# Altium PCB Interface-Board_v3.3.PcbDoc (part 3 of 3)
Units mil, origin at the board's own origin, x right, y up, seen from the top; angles counter-clockwise.
Board outline 1629.92 x 1653.54 mil, 4 copper layers (Top Layer, Power, Ground, Bottom Layer), stack 61.899 mil thick; 90 components, 56 nets, 294 pads, 167 vias.
Unrouted connection lines stored in the file: 1.
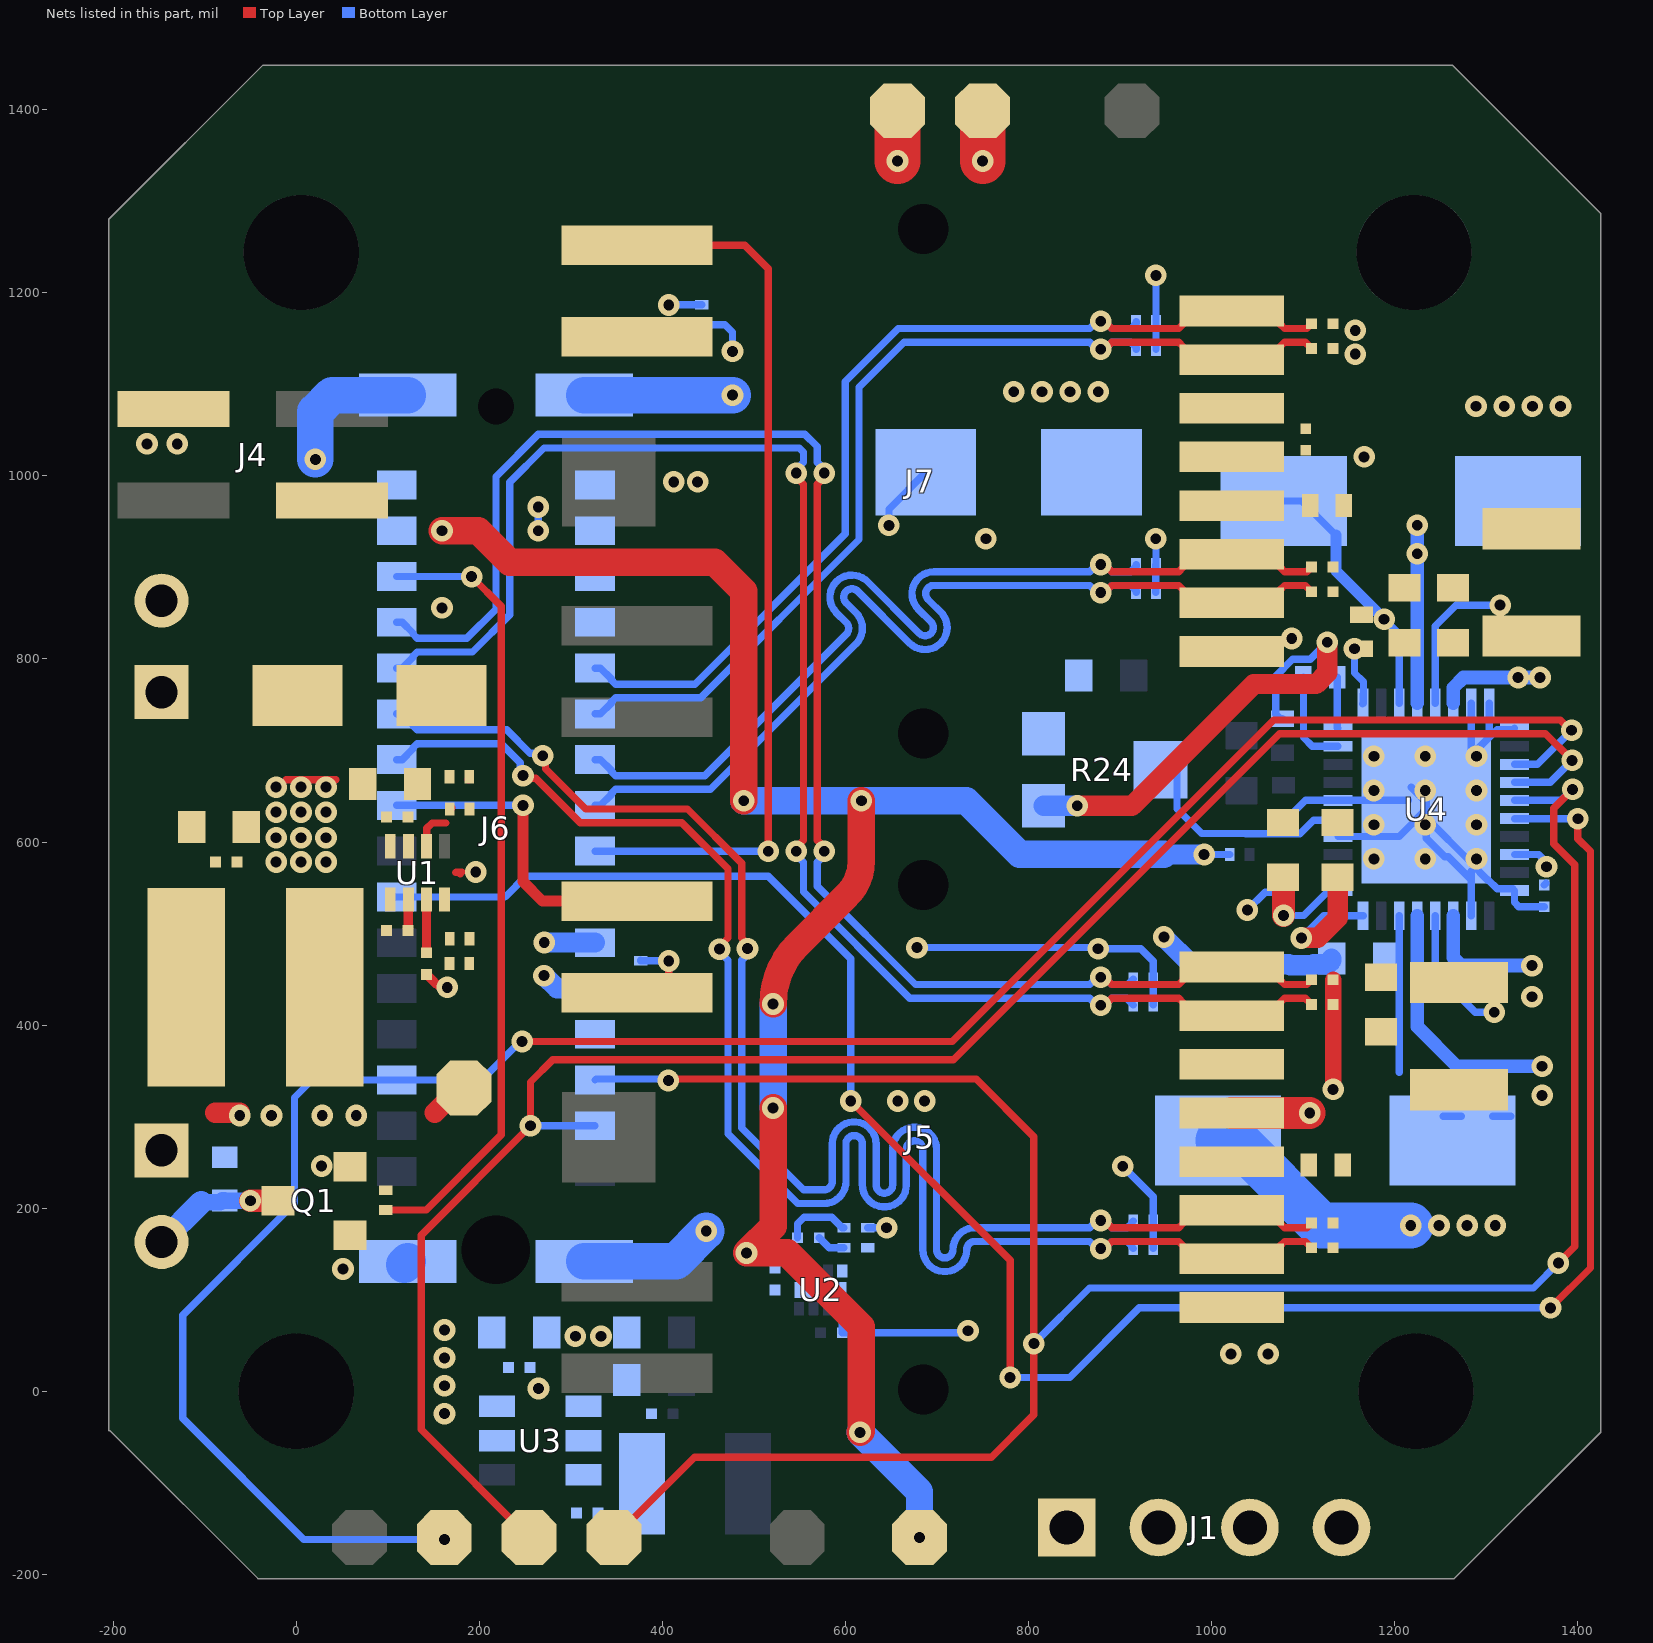
[diagram p4: the nets of this part, all layers, seen from the top]

## Via types
v1: diameter 23.62, hole 11.81, Top Layer to Bottom Layer, tented both sides, 135 vias
v2: diameter 23.62, hole 11.81, Top Layer to Bottom Layer, 32 vias

## Nets (pads, with @x,y where several pads share a name; then routed paths per layer and width w, separated by ;. In a path a pad name is that pad's centre, name@x,y a point inside that pad or via, vN(x,y) a via of type N, cw(c..) or ccw(c..) an arc to the next point about the centre after c; other vN are vias at no path point) (continued)
GND: C2.1 C3.1 C4.1 C5.1 C6.1 C9.1 C10.1 C11.1 C12.1 C13.2 C14.1 C15.1 C16.2 C17.2 C18.2 C19.2 C20.2 C21.2 C22.2 C23.2 C24.2 C25.2 C26.2 C27.1 C28.2 C29.2 C30.1 C31.1 C34.1 C35.2 C36.2 C37.2 D3.1 J2.2 J4.4 J6.A12 J6.A13 J6.MP1 J6.MP2 J6.MP3 J6.MP4 P10.1 Q1.2 R3.1 R4.1 R6.1 R7.2 R12.1 R17.1 R21.2 R22.2 R24.1 SB1.2 SB2.2 U1.4 U2.5 U2.9 U3.4 U4.1 U4.10 U4.12 U4.22 U4.24 U4.35 U4.36 U4.37 | length 2908.6
  Top Layer w8: -10.92,668.02 43.56,668.02 ; 174.38,566.68 174.89,567.19 181.12,567.19 179.15,565.22
  Top Layer w10: C6.1@142.34,455.41 150.63,447.12 ccw(c165.1,461.6) v1(165.1,441.12) v1@162.5,443.73
  Top Layer w18: v1(1132.89,329.74) C18.2@1132.89,422.45 C16.2@1132.89,449.58
  Top Layer w22: v1(853.39,639.56) 913.26,639.56 1046.26,772.56 1114.34,772.56 1126.51,784.73 v1(1126.51,818.18)
  Top Layer w50: v1(657.03,1344) P10.1@657.03,1398.9
  Bottom Layer w8: v1(270.82,454.03) v1@271.05,454.03 ; R17.1@443,1165.17 468.6,1165.17 476.77,1157 v1(476.77,1136) ; U2.9@573,110.66 591.96,110.66 596.62,106 U2.5@596.62,89.99 C9.1@596.62,63.79 731.79,63.79 v1(734,66) ; R6.1@624.47,178.5 v1(645.09,178.5) ; v1(647.61,945.87) 647.61,963.71 D3.1@687.87,1003.97 ; C27.1@1077.41,734.62 1075.14,734.62 1070.14,739.62 1070.14,781.04 1088.6,799.5 1107.83,799.5 v1(1126.51,818.18) ; C35.2@1078.89,625.15 1082.39,625.15 1102.7,645.47 U4.24@1138.14,645.47 U4.37@1214.85,645.47 ; U4.22@1138.14,606.1 1205.07,606.1 U4.37@1234.59,635.63 ; U4.37@1218.35,659.75 1234.59,643.5 U4.37@1234.59,635.63 ; U4.12@1283.81,519.48 U4.37@1283.81,554.92 ; U4.37@1283.81,568.09 U4.37@1283.81,554.92 ; U4.35@1283.81,751.77 1283.81,694.68 U4.37@1303.49,714.37 ; U4.36@1303.49,751.77 U4.37@1303.49,714.37 ; U4.1@1331.05,724.21 1329.77,722.93 1312.05,722.93 U4.37@1303.49,714.37 ; C34.1@1363.49,529.33 1335.74,529.33 1331.05,534.01 U4.10@1331.05,547.04 1329.15,548.95 1312.05,548.95 1302.08,558.92 1301.46,558.92 1284.54,575.84 1284.54,576.46 U4.37@1234.59,626.41 ; U4.37@1234.59,626.41 1234.59,604.13 1254.72,584.01 1258.72,584.01 1283.81,558.92 U4.37@1283.81,554.92 ; U4.37@1234.59,626.41 U4.37@1234.59,635.63
  Bottom Layer w22: v1@271.05,454.03 285.08,440 J6.A12@326.54,440 ; R24.1@816.36,639.56 v1(853.39,639.56) ; v1(948.01,496.26) 977.82,466.45 1084.72,466.45 1085.85,465.32 1110.54,465.32 1111.67,466.45 1127.29,466.45 1131.29,470.45 C31.1@1131.29,472.48
  Bottom Layer w40: v1(21,1018) 21,1069.86 39.37,1088.23 J6.MP2@121.81,1088.23 ; J6.MP3@118.19,138.15 J6.MP3@121.81,141.77 ; J6.MP4@314.72,141.77 414.77,141.77 v1(448,175) ; J6.MP1@314.72,1088.23 v1(476.77,1088.23)
  Bottom Layer w50: C29.2@1007.29,274 1026.98,274 1119.98,181 v1(1217.77,181)
  other v1: 51.21,133.47 1248.56,181 1279.34,181 1310.12,181 27.82,245.98 196.12,567.19 1177.48,581.51 1233.53,581.51 1289.59,581.51 1177.48,618.88 1233.53,618.88 1289.59,618.88 1177.48,656.25 1233.53,656.25 1289.59,656.25 1177.48,693.62 1233.53,693.62 1289.59,693.62 1289,1076 1319.78,1076 1350.56,1076 1381.34,1076 1157,1133 1157,1159
  other v2: 264.79,3 305.07,60 333.05,60 -21.92,578.13 5.32,578.13 32.56,578.13 -21.92,604.55 5.32,604.55 32.56,604.55 -21.92,632.61 5.32,632.61 32.56,632.61 -21.92,660.02 5.32,660.02 32.56,660.02
GND_ETH: C26.1 J5.4 J5.8 J7.4 J7.8 | length 96.8
  Top Layer w8: J7.8@1021.91,808.1 J7.8@1025.12,811.31 ; v1@1163.73,1022.04 1167.01,1018.76 1166.71,1018.76 v1@1164.73,1018.76
  Top Layer w35: J5.4@1021.91,303.98 v1(1107.3,303.98)
  other v1: 1021.23,40.79 1061.83,40.79 1087.61,822.29 1166.71,1020.76
LINK0: J5.9 J6.B8 | length 354.5
  Top Layer w12: v1(247.84,640) 247.84,556.65 269.2,535.28 J5.9@372.31,535.28
  Bottom Layer w8: J6.B8@110,640 v1(247.84,640)
LINK1: J6.A9 J7.9 | length 979.6
  Top Layer w8: J7.9@372.31,1252 490,1252 515.77,1226.23 v1(515.77,590)
  Bottom Layer w8: J6.A9@326.54,590 v1(515.77,590)
MISO: J6.A14 P7.1 U4.5 | length 2546.4
  Top Layer w8: P7.1@347.16,-160 435.16,-72 759.74,-72 806,-25.74 v1(806,52) 806,277.98 742.98,341 408.25,341 v1(406.63,339.38) ; v1(1379,140) 1397,158 1397,575 1374,598 1374,636.92 v1(1394.56,657.48)
  Bottom Layer w8: J6.A14@326.54,340 327.54,341 405.01,341 v1(406.63,339.38) ; v1(806,52) 866.8,112.8 1351.8,112.8 v1(1379,140) ; U4.5@1331.05,645.47 1382.06,645.47 1394.07,657.48 v1(1394.56,657.48)
MOSI: J6.A15 P9.1 U4.4 | length 2047.4
  Top Layer w8: P9.1@254.6,-160 136.51,-41.91 136.51,170.51 v1(256,290) 256,337.8 280.39,362.19 718.19,362.19 1074.3,718.3 1364.94,718.3 v1(1394.03,689.21)
  Bottom Layer w8: v1(256,290) J6.A15@326.54,290 ; U4.4@1331.05,665.15 1369.97,665.15 v1(1394.03,689.21)
MOTOR_A1: J1.1 U4.34 | length 116.3
  Bottom Layer w15: U4.34@1264.12,751.77 1264.12,768.59 1275.27,779.73 v1(1358.97,779.73)
  other v1: 1335,779.73
MOTOR_A2: J1.2 U4.32 | length 194.2
  Bottom Layer w15: U4.32@1224.75,751.77 v1(1224.75,946)
  other v1: 1224.75,915
MOTOR_B1: J1.3 U4.13 | length 135.4
  Bottom Layer w15: U4.13@1264.12,519.48 1264.12,473.79 1272.91,465 v1(1350.17,465)
  other v1: 1350.17,431
MOTOR_B2: J1.4 U4.15 | length 278
  Bottom Layer w15: U4.15@1224.75,519.48 1224.75,398.25 1267.97,355.03 v1@1360.09,355.03
  Bottom Layer w50: J1.4@1142,-149 J1.4@1144.49,-146.51
  other v1: 1361.17,323.21 1361.17,355.03
NetC1_1: C1.1 U1.6 | length 34
  Top Layer w8: C1.1@122.21,503.22 C1.1@122.39,503.39 ; U1.6@122.39,536.91 U1.6@122.56,537.08
  Top Layer w10: C1.1@122.39,503.39 U1.6@122.39,536.91
NetC1_2: C1.2 L1.1 U1.5
NetC6_2: C6.2 U1.7 | length 56
  Top Layer w10: C6.2@142.24,481.12 U1.7@142.24,537.08
NetC7_1: C7.1 L2.1 U3.5
NetC7_2: C7.2 U3.6
NetC8_1: C8.1 R5.1 R6.2 U2.4 | length 31.6
  Bottom Layer w8: C8.1@571.43,167.66 582.25,156.84 R5.1@598.49,156.84
NetC32_1: C32.1 U4.29 | length 74.4
  Bottom Layer w8: v1(1156.32,811.18) 1156.32,784.68 1166,775 1166,752 U4.29@1165,751 ; U4.29@1165.7,751.77 U4.29@1165.7,761.61
NetC33_1: C33.1 U4.28 | length 56.1
  Bottom Layer w8: C33.1@1137.5,780 1137.5,724.85 U4.28@1138.14,724.21
NetC33_2: C33.2 U4.27 | length 107.5
  Bottom Layer w8: C33.2@1100.5,780 1100.5,714.12 1110.1,704.52 U4.27@1138.14,704.52
NetC36_1: C36.1 R21.1 U4.33 | length 164.6
  Bottom Layer w8: U4.33@1244.44,751.77 1244.44,836.03 1267.22,858.81 v1(1315.3,858.81)
NetC37_1: C37.1 R22.1 U4.14 | length 145.4
  Bottom Layer w8: U4.14@1244.44,519.48 1244.44,457.78 1288.24,413.97 v1@1310,413.97
  other v1: 1309,413.97
NetD2_2: D2.2 J2.1
NetJ5_10: J5.10 R12.2 | length 90.2
  Top Layer w8: J5.10@372.31,435.28 389.35,435.28 407,452.94 v1(407,469.98)
  Bottom Layer w8: R12.2@376.14,470.76 R12.2@376.54,470.37 406.61,470.37 v1(407,469.98)
NetJ7_10: J7.10 R17.2 | length 35.9
  Bottom Layer w8: v1@407.13,1186.83 R17.2@443,1186.83
  other v1: 407,1186.69
NetR1_1: R1.1 R4.2 U1.2 | length 48.4
  Top Layer w8: U1.2@142.24,595.35 142.73,595.84 142.73,614.93 148.58,620.78 163.26,620.78 ; R4.2@168.58,634.16 168.58,636.12 R4.2@169.89,637.44 ; R1.1@187.89,668.02 R1.1@189.17,669.31
NetR2_1: R2.1 R3.2 U1.8
NetR23_1: R23.1 R24.3
NetR24_2: R24.2 U4.23 | length 236.6
  Bottom Layer w8: R24.2@962.31,678.93 962.31,636.33 989.42,609.22 1037.49,609.22 1037.56,609.15 1096.77,609.15 1111.5,623.88 1136.23,623.88 U4.23@1138.14,625.78
NetSB1_1: SB1.1 U4.19 | length 114.4
  Top Layer w25: v1(1078.81,519.72) 1078.81,561.81 SB1.1@1080,563
  Bottom Layer w8: v1(1078.81,519.72) 1100.72,519.72 1126.14,545.14 1136.23,545.14 U4.19@1138.14,547.04
NetSB2_1: SB2.1 U4.18 | length 172.7
  Top Layer w22: v1(1098.2,495.13) 1098.51,495.45 1116.4,495.45 1137.89,516.93 SB2.1@1137.89,563.32
  Bottom Layer w8: v1(1098.2,495.13) 1122.54,519.48 U4.18@1165.7,519.48
OPTO_IN: J6.B3 Q1.1 R7.1 | length 865.2
  Top Layer w8: R7.1@97.81,198 142,198 224,280 224,857.65 v1(191.65,890)
  Bottom Layer w8: J6.B3@110,890 v1(191.65,890)
RCS: D1.1 J3.2 Q1.3 | length 146.2
  Top Layer w25: v1(-50.02,208) Q1.3@-19.96,208
  Bottom Layer w18: -103.75,206.35 -82.78,206.35 -80.75,208.38 D1.1@-78,208.38 ; D1.1@-78,208 v1(-50.02,208) v1@-50.2,208.19
  Bottom Layer w25: J3.2@-147.1,163 -103.75,206.35
RXA_N: C22.1 J5.7 J6.B7 R15.2 | length 1799.7
  Top Layer w8: v1(247.84,672.5) 250.83,669.51 261.88,669.51 310.26,621.12 421.3,621.12 471.81,570.61 471.81,495.04 464,487.23 v1@464,483 ; v1(462.51,482.97) v1@463.97,482.97 ; v1(879,155.8) 883.23,155.8 891.04,163.61 964.14,163.61 968.83,158.92 968.83,157.27 981.56,144.54 J5.7@1021.91,144.54 1062.27,144.54 1075,157.27 1075,158.92 1079.69,163.61 1102.37,163.61 C22.1@1109.27,156.7
  Bottom Layer w8: J6.B7@110,690 115.91,690 127.65,701.75 127.65,702.81 132.34,707.5 223.89,707.5 244.85,686.54 244.85,675.49 v1(247.84,672.5) ; v1(462.51,482.97) 464,482.97 464,478.77 471.81,470.96 471.81,281.32 548.13,205 565.13,205 576.63,205 ccw(c576.63,229) 600.63,229 600.63,270.19 cw(c609.63,270.19) 618.63,270.19 618.63,225.31 ccw(c642.63,225.31) 666.63,225.31 666.63,264.47 cw(c675.63,264.47) 684.63,264.47 684.63,154.61 ccw(c708.63,154.61) 732.63,154.61 cw(c741.63,154.61) 741.63,163.61 828,163.61 866.96,163.61 874.77,155.8 v1(879,155.8) 883.23,155.8 891.04,163.61 907.84,163.61 912.76,158.69 912.76,157.75 R15.2@914.67,155.85
RXA_P: C20.1 J5.6 J6.B6 R13.2 | length 1798.3
  Top Layer w8: v1(269.49,694.15) 272.48,691.16 272.48,680.12 316.48,636.12 427.51,636.12 486.81,576.83 486.81,495.04 494.62,487.23 494.62,483.57 v1(493.12,483.57) ; v1(879,186.42) 883.23,186.42 891.04,178.61 964.14,178.61 968.83,183.3 968.83,184.95 981.56,197.69 J5.6@1021.91,197.69 1062.27,197.69 1075,184.95 1075,183.3 1079.69,178.61 1104.05,178.61 C20.1@1109.27,183.83
  Bottom Layer w8: J6.B6@110,740 115.91,740 127.65,728.25 127.65,727.19 132.34,722.5 230.1,722.5 255.46,697.14 266.5,697.14 v1(269.49,694.15) ; v1(493.12,483.57) 493.69,483 494.62,483 494.62,478.77 486.81,470.96 486.81,287.53 554.34,220 565.13,220 576.63,220 ccw(c576.63,229) 585.63,229 585.63,270.19 cw(c609.63,270.19) 633.63,270.19 633.63,225.31 ccw(c642.63,225.31) 651.63,225.31 651.63,264.47 cw(c675.63,264.47) 699.63,264.47 699.63,154.61 ccw(c708.63,154.61) 717.63,154.61 cw(c741.63,154.61) 741.63,178.61 828,178.61 866.96,178.61 874.77,186.42 v1(879,186.42) 883.23,186.42 891.04,178.61 908.08,178.61 912.76,183.3 912.76,184 R13.2@914.67,185.91
RXB_N: C23.1 J6.A8 J7.7 R16.2 | length 1122.2
  Top Layer w8: v1(879,872.52) 883.23,872.52 891.04,880.33 964.14,880.33 968.83,875.64 968.83,873.98 981.56,861.25 J7.7@1021.91,861.25 1062.27,861.25 1075,873.98 1075,875.64 1079.69,880.33 1102.37,880.33 C23.1@1109.27,873.42
  Bottom Layer w8: J6.A8@326.54,640 332.44,640 344.19,651.75 344.19,652.81 348.88,657.5 452.6,657.5 572.78,777.68 611.59,816.49 ccw(c594.62,833.46) 611.59,850.43 600.76,861.26 cw(c607.15,867.6) 613.54,873.94 670.16,817.32 ; 670.17,817.31 ccw(c687.17,834.25) 704.14,817.28 ccw(c687.17,834.25) 706.33,848.7 706.33,849.03 690.39,864.97 cw(c696.76,871.33) 696.76,880.33 727.36,880.33 866.96,880.33 ; 866.97,880.31 874.77,872.52 v1(879,872.52) 883.23,872.52 891.04,880.33 911.81,880.33 917.65,874.48 R16.2@917.65,872.52
RXB_P: C21.1 J6.A7 J7.6 R14.2 | length 1120.8
  Top Layer w8: v1(879,903.14) 883.23,903.14 891.04,895.33 964.14,895.33 968.83,900.01 968.83,901.67 981.56,914.4 J7.6@1021.91,914.4 1062.27,914.4 1075,901.67 1075,900.01 1079.69,895.33 1104.05,895.33 C21.1@1109.27,900.55
  Bottom Layer w8: J6.A7@326.54,690 332.44,690 344.19,678.25 344.19,677.19 348.88,672.5 446.39,672.5 562.17,788.28 600.99,827.1 ccw(c594.62,833.46) 600.99,839.82 590.21,850.6 cw(c607.15,867.6) 590.16,884.55 ; 590.21,884.59 cw(c607.15,867.6) 621.6,886.77 621.93,886.77 680.83,827.86 ccw(c687.17,834.25) 693.53,827.89 ccw(c687.17,834.25) 693.51,840.64 679.81,854.34 cw(c696.76,871.33) 696.76,895.33 712.36,895.33 866.96,895.33 874.77,903.14 v1(879,903.14) 883.23,903.14 891.04,895.33 911.84,895.33 917.65,901.14 R14.2@917.65,903.11
SCK: J6.B14 P5.1 U4.3 | length 2390.6
  Top Layer w8: v1(246.81,382) 716.79,382 1068.09,733.3 1380.94,733.3 1392.17,722.07 v1(1393.44,722.07)
  Bottom Layer w8: v1(162.05,-162) 8.26,-162 -124,-29.74 -124,83.12 -1.85,205.27 -1.85,320.91 17.24,340 J6.B14@110,340 202.76,340 244.76,382 v1(246.81,382) ; U4.3@1331.05,684.84 1356.2,684.84 v1(1393.44,722.07)
STEP: J6.B10 U4.6 | length 2321.3
  Top Layer w8: v1(606,317) 780,143 v1(780,15) ; v1(1370.45,91) 1414,134.55 1414,590 1400.31,603.69 v1(1400.31,625.4)
  Bottom Layer w8: J6.B10@110,540 228.25,540 251,562.75 515.83,562.75 606,472.58 v1(606,317) ; v1(780,15) 845,15 921,91 v1(1370.45,91) ; U4.6@1331.43,625.4 v1(1400.31,625.4)
TXA_N: C18.1 J5.2 J6.B5 R10.2 | length 1796.7
  Top Layer w8: v1(546.39,590) 546.39,594.23 554.2,602.04 554.2,990.96 546.39,998.77 v1(546.39,1003) ; v1(879,421.55) 883.23,421.55 891.04,429.36 964.14,429.36 968.83,424.67 968.83,423.02 981.56,410.28 J5.2@1021.91,410.28 1062.27,410.28 1075,423.02 1075,424.67 1079.69,429.36 1102.37,429.36 C18.1@1109.27,422.45
  Bottom Layer w8: J6.B5@110,790 115.91,790 127.65,801.75 127.65,802.81 132.34,807.5 192.66,807.5 233.27,848.11 233.27,993 270.77,1030.5 549.51,1030.5 554.2,1025.81 554.2,1015.04 546.39,1007.23 v1(546.39,1003) ; v1(546.39,590) 546.39,585.77 554.2,577.96 554.2,545.59 670.43,429.36 866.96,429.36 874.77,421.55 883.23,421.55 891.04,429.36 907.4,429.36 912.76,423.99 912.76,423.91 R10.2@914.67,422
TXA_P: C16.1 J5.1 J6.B4 R8.2 | length 1795.4
  Top Layer w8: v1(577.01,590) 577.01,594.23 569.2,602.04 569.2,990.96 577.01,998.77 v1(577.01,1003) ; v1(879,452.17) 883.23,452.17 891.04,444.36 964.14,444.36 968.83,449.04 968.83,450.7 981.56,463.43 J5.1@1021.91,463.43 1062.27,463.43 1075,450.7 1075,449.04 1079.69,444.36 1104.05,444.36 C16.1@1109.27,449.58
  Bottom Layer w8: J6.B4@110,840 115.91,840 127.65,828.25 127.65,827.19 132.34,822.5 186.44,822.5 218.27,854.32 218.27,999.21 264.55,1045.5 555.73,1045.5 569.2,1032.02 569.2,1015.04 577.01,1007.23 v1(577.01,1003) ; v1(577.01,590) 577.01,585.77 569.2,577.96 569.2,551.8 676.65,444.36 866.96,444.36 874.77,452.17 883.23,452.17 891.04,444.36 908.67,444.36 R8.2@914.67,450.36
TXB_N: C19.1 J6.A6 J7.2 R11.2 | length 1122.4
  Top Layer w8: v1(879,1138.26) 883.23,1138.26 891.04,1146.07 964.14,1146.07 968.83,1141.39 968.83,1139.73 981.56,1127 J7.2@1021.91,1127 1062.27,1127 1075,1139.73 1075,1141.39 1079.69,1146.07 1102.37,1146.07 C19.1@1109.27,1139.17
  Bottom Layer w8: J6.A6@326.54,740 332.44,740 344.19,751.75 344.19,752.81 348.88,757.5 441.9,757.5 614.82,930.42 614.82,1096.82 664.07,1146.07 866.96,1146.07 874.77,1138.26 v1(879,1138.26) 883.23,1138.26 891.04,1146.07 911.81,1146.07 917.65,1140.23 R11.2@917.65,1138.26
TXB_P: C17.1 J6.A5 J7.1 R9.2 | length 1121.6
  Top Layer w8: v1(879,1168.89) 883.23,1168.89 891.04,1161.07 964.14,1161.07 968.83,1165.76 968.83,1167.42 981.56,1180.15 J7.1@1021.91,1180.15 1062.27,1180.15 1075,1167.42 1075,1165.76 1079.69,1161.07 1104.05,1161.07 C17.1@1109.27,1166.29
  Bottom Layer w8: J6.A5@326.54,790 332.44,790 344.19,778.25 344.19,777.19 348.88,772.5 435.69,772.5 599.82,936.64 599.82,1103.04 657.86,1161.07 866.96,1161.07 874.77,1168.89 v1(879,1168.89) 883.23,1168.89 891.04,1161.07 912.02,1161.07 917.65,1166.71 R9.2@917.65,1168.68
VCC_3V3: C8.2 C10.2 C34.2 J6.B1 J6.B2 P6.1 R5.2 R19.2 R20.2 U2.1 U2.2 U4.8 | length 2281.2
  Top Layer w30: v1(159.38,940) 199,940 233.25,905.75 457.25,905.75 489,874 v1(489,645) ; v1(521,309.45) 521,180 v1(492,151) 536.79,151 617.19,70.6 617.19,-43.81 v2(616,-45) ; v1(521,423) cw(c612.74,423) 547.87,487.87 602.12,542.12 ccw(c564.95,579.28) 617.51,579.28 v1(617.51,645)
  Bottom Layer w8: C8.2@547.8,167.66 547.8,182.91 554.89,190 585.01,190 596.52,178.49 R5.2@598.49,178.49 ; v1(992,586.41) R19.2@1019.96,586.41 ; v1(1039.24,525.72) 1058.6,545.07 R20.2@1083.23,545.07 ; U4.8@1331.05,586.41 1357.42,586.41 1371.2,572.63 v1@1371.2,568.41 ; C34.2@1363.49,552.95 C34.2@1365.4,554.85 ; v1@1366.05,569.01 1366.32,569.28 v1@1371.2,569.28
  Bottom Layer w22: 948.01,586.41 v1(992,586.41)
  Bottom Layer w30: v1(489,645) 732.06,645 790.65,586.41 948.01,586.41 ; v1(521,309.45) v1(521,423) ; v2(616,-45) 681,-110 v2(681,-160)
  other v1: 1366.05,573.01
VDD_5V: J4.1 J6.A11 | length 55.6
  Bottom Layer w8: J6.A11@326.39,490.15 J6.A11@326.54,490
  Bottom Layer w22: v1(271.05,490.15) J6.A11@326.39,490.15
  other v1: -163,1035 -130,1035
VDDTXRX1: C24.1 J5.3 J5.5 J6.A1 J6.A2 R8.1 R10.1 R13.1 R15.1 | length 443.5
  Bottom Layer w8: v1(264.55,940) v1(264.55,966) ; v1(678.31,484.67) v1@874.77,484.67 ; v1(903.06,245.77) 936.32,212.51 R15.1@936.32,155.85 ; R10.1@936.32,422 936.32,469.64 922.65,483.32 v1(876.13,483.32) ; v1@874.77,484.67 v1(876.13,483.32) ; v1@874.77,484.67 v1(876.13,483.32)
VDDTXRX2: C25.1 J6.A3 J6.A4 J7.3 J7.5 R9.1 R11.1 R14.1 R16.1 | length 140.3
  Bottom Layer w8: R14.1@939.16,903.11 939.16,872.66 R16.1@939.31,872.52 ; R14.1@939.31,903.11 v1@939.31,931.97 ; R11.1@939.31,1138.26 R9.1@939.31,1168.68 v1(939.31,1219)
  other v1: 753.51,931.21 939.02,931.21 412.59,993.43 438.59,993.43
VIN: C2.2 C3.2 C28.1 C29.1 C30.2 C31.2 C32.2 D2.1 D3.2 P2.1 R1.2 U1.3 U4.16 U4.31 | length 570.7
  Top Layer w8: C3.2@122.21,627.22 C3.2@122.39,627.05 ; C2.2@122.21,652.87 C2.2@132.56,663.22 ; U1.3@122.39,595.53 U1.3@122.56,595.35 ; v1(159.38,855.75) v1@162.23,855.75
  Top Layer w50: v1(750,1344) P2.1@750,1398.9
  Bottom Layer w8: v1@784,1097 v1@787,1097 ; C28.1@1079,972.55 1098.69,972.55 C28.1@1136,935.23 ; v1(1188.6,843.42) 1205.07,826.95 U4.31@1205.07,751.77 ; 1205.07,348.55 U4.16@1205.07,519.48 ; C29.1@1253.27,300.35 C29.1@1272.95,300.35 ; C29.1@1307.43,300.35 C29.1@1327.11,300.35
  Bottom Layer w12: C28.1@1136,935.23 1136,896.05 v1(1188.6,843.42)
  other v1: 657.17,317 686.64,317 784,1092 814.78,1092 845.56,1092 876.34,1092
VOUT_12V: C4.2 C5.2 C11.2 C12.2 D1.2 J3.1 L1.2 P1.1 R2.2 U3.2 U3.3 | length 85.7
  Top Layer w22: -88.35,304.25 v2@-61.56,304.25 ; 151.34,304.25 178.39,331.3 P1.1@183.23,331.3 ; P1.1@187.39,331.3 187.39,340.3 P1.1@192.23,345.14
  other v2: 162.05,-24.5 162.05,5.94 162.05,36.39 162.05,66.84 -61.56,301.25 -26.96,301.25 28.4,301.25 65.69,301.25
pads on no net: J5.11 J5.12 J5.EP J5.MH1 J5.MH2 J6.A16 J6.B16 J6.MH J6.MH1 J7.11 J7.12 J7.EP J7.MH1 J7.MH2 U1.1 U2.3 U4.9 U4.11 U4.17

## Polygon pours and split planes (outlines as drawn)
VDDTXRX1 on Top Layer "VDDTXRX1_L01_P002" (solid, pour order 2): 891.04,504 891.04,501.96 891.04,488.21 855,452.17 855,373.87 903.06,373.87 903.06,226 828,226 828,457.67 874.33,504 888,504
VDDTXRX2 on Top Layer "VDDTXRX2_L01_P000" (solid, pour order 0): 1116.49,993.2 1116.49,942 955,942 955,923 954,922 734,922 734,993.2
GND on Ground (split plane): 1405.09,1278.41 1405.09,-36.48 1256.94,-184.63 -33.49,-184.63 -184.63,-33.48 -184.63,1271.95 -27.86,1428.72 1254.78,1428.72
GND_ETH on Ground (split plane): 1196.43,805.45 1111.67,720.7 1109.8,718.41 1108.41,715.81 1107.55,712.98 1107.26,710.04 1107.26,362.79 1107.26,25.89 991.83,25.89 991.83,1046.94 1196.43,1046.94
VCC_3V3 on Power (split plane): 1405.09,508.93 975.19,508.93 975.19,722.99 1405.09,722.99
MOTOR_B1 on Power (split plane): 1405.09,397.18 1098,397.18 1095.06,396.89 1092.23,396.03 1089.63,394.64 1087.34,392.77 1085.47,390.48 1084.07,387.88 1083.22,385.05 1082.93,382.11 1082.93,-184.63 1007.07,-184.63 1007.07,-71.27 1006.78,-68.33 1005.93,-65.5 1004.53,-62.9 1002.66,-60.61 975.19,-33.15 975.19,478.79 1405.09,478.79
VDDTXRX2 on Power (split plane): 776.93,1005.63 776.93,887.59 708.48,887.59 706.15,887.36 703.83,887.59 352.68,887.59 352.68,1027.93 776.93,1027.93
MOTOR_A1 on Power (split plane): 1405.09,753.14 975.19,753.14 975.19,865.97 1277.9,865.97 1280.84,866.26 1283.67,867.12 1286.28,868.51 1288.56,870.39 1290.43,872.67 1291.83,875.28 1292.68,878.1 1292.97,881.04 1292.97,974 1292.68,976.94 1291.83,979.77 1290.43,982.37 1288.56,984.66 1286.28,986.53 1283.67,987.93 1280.84,988.78 1277.9,989.07 887.91,989.07 884.97,988.78 882.14,987.93 879.54,986.53 877.25,984.66 875.38,982.37 873.98,979.77 873.13,976.94 872.84,974 872.84,607.04 872.84,-184.63 807.07,-184.63 807.07,1027.93 1405.09,1027.93
MOTOR_B2 on Power (split plane): 1405.09,-36.48 1256.94,-184.63 1113.07,-184.63 1113.07,367.04 1405.09,367.04
MOTOR_A2 on Power (split plane): 1262.83,896.12 960.12,896.12 957.18,895.83 954.35,894.97 951.74,893.58 949.46,891.7 947.59,889.42 946.19,886.81 945.34,883.98 945.05,881.04 945.05,-39.39 945.34,-42.33 946.19,-45.16 947.59,-47.76 949.46,-50.05 976.93,-77.51 976.93,-184.63 902.98,-184.63 902.98,612.16 902.98,958.93 1262.83,958.93
VIN on Power (split plane): 1405.09,1278.41 1405.09,1058.07 209,1058.07 206.06,1057.78 203.23,1056.93 200.63,1055.53 198.34,1053.66 196.47,1051.37 195.07,1048.77 194.22,1045.94 193.93,1043 193.93,735.64 194.22,732.7 195.07,729.87 196.47,727.26 198.34,724.98 200.63,723.1 203.23,721.71 206.06,720.85 209,720.56 500.7,720.56 500.7,451.37 500.99,448.43 501.84,445.6 503.24,443 505.11,440.71 507.39,438.84 510,437.44 512.83,436.59 515.77,436.3 693.41,436.3 693.41,95.07 433.07,95.07 433.07,365.96 433.07,515 432.78,517.94 431.93,520.77 430.53,523.37 428.66,525.66 426.37,527.53 423.77,528.93 420.94,529.78 418,530.07 -79.93,530.07 -79.93,1376.66 -27.86,1428.72 1254.78,1428.72
VDDTXRX1 on Power (split plane): 322.54,872.52 322.83,869.58 323.68,866.75 325.08,864.14 326.95,861.86 329.24,859.98 331.84,858.59 334.67,857.73 337.61,857.44 693.41,857.44 693.41,466.44 530.84,466.44 530.84,735.64 530.55,738.58 529.69,741.4 528.3,744.01 526.43,746.29 524.14,748.17 521.54,749.56 518.71,750.42 515.77,750.71 224.07,750.71 224.07,1027.93 322.54,1027.93
VDD_5V on Power (split plane): -110.07,515 -109.78,512.06 -108.93,509.23 -107.53,506.63 -105.66,504.34 -103.37,502.47 -100.77,501.07 -97.94,500.22 -95,499.93 402.93,499.93 402.93,381.04 -184.63,381.04 -184.63,1271.95 -110.07,1346.51
5V_EXT on Power (split plane): 776.93,-184.63 629.95,-184.63 627.94,-184.02 625,-183.73 562,-183.73 559.06,-184.02 557.05,-184.63 -33.49,-184.63 -160.85,-57.26 297.32,-57.26 418,-57.26 420.94,-56.97 423.77,-56.11 426.37,-54.72 428.66,-52.85 430.53,-50.56 431.93,-47.96 432.78,-45.13 433.07,-42.19 433.07,64.93 625,64.93 708.48,64.93 711.42,65.22 714.25,66.07 716.86,67.47 719.14,69.34 721.02,71.63 722.41,74.23 723.27,77.06 723.56,80 723.56,857.44 776.93,857.44
VOUT_12V on Power (split plane): 402.93,302.42 402.93,80 402.93,-27.12 297.32,-27.12 -184.63,-27.12 -184.63,350.89 402.93,350.89

## Other copper
Top Layer:
  region net VOUT_12V: 188,281 188,320.93 -86,320.93 -86,281
  rectangle net VIN: 116.07,582 129,673
  rectangle net VOUT_12V: 183.91,317 209,476
  rectangle net VDDTXRX2: 924.09,1051.21 1079,1090.58
  rectangle net VDDTXRX2: 924.09,955.05 954,1057.12
  rectangle net GND: -23.8,953.31 101,1038
  rectangle net GND: 1126.99,1062.01 1171,1173
  rectangle net GND: 1097.08,1045.66 1400,1077
  rectangle net GND: 1126.99,967.6 1406.66,993.2
  rectangle net GND: 1126.99,900.01 1176.23,993.2
  rectangle net GND: 1126.99,867.51 1138.8,993.2
  rectangle net GND: 1255,915 1406.66,1077
  rectangle net GND: 1255,862.54 1281.62,964.65
  rectangle net GND: 1193.47,862.54 1281.62,892.54
  rectangle net GND: 1060.87,606.1 1193.47,636.32
  rectangle net GND: 1211.5,150.8 1324.2,351.74
  rectangle net GND: 1126.99,150.8 1152.39,206
  rectangle net GND: 1134.39,150.8 1178.92,259.7
  rectangle net GND: 1167.62,150.8 1228.17,407.49
  rectangle net GND: 1123.89,444 1141.89,458.58
  rectangle net GND_ETH: 964.83,1003.97 1185.23,1037.43
  rectangle net GND_ETH: 964.83,791.37 1107.7,835
  rectangle net GND_ETH: 964.83,20.26 1079,108.12
  rectangle net VDD_5V: -195.02,1020 -73,1092.69
  rectangle net VDDTXRX1: 891.04,224.79 938.39,373.87
  rectangle net VDDTXRX1: 891.04,341 1079,373.87
  rectangle net VDDTXRX1: 891.04,226 1121.08,267.57
  rectangle net VDDTXRX2: 734,947 762,1126
  rectangle net VDDTXRX2: 851,1203 954,1237
  rectangle net VIN: 116,663.22 172.86,874.25
  rectangle net NetJ7_10: 289.63,1130.35 427.51,1203.94
  rectangle net NetJ5_10: 289.63,413.63 427.51,487.23
  rectangle net NetC37_1: 1289.59,392.49 1324.2,437.49
  rectangle net NetC37_1: 1167.62,422.49 1324.2,469.07
  rectangle net NetC36_1: 1292.66,825.1 1403.2,877.54
  rectangle net NetC36_1: 1244.44,798.54 1403.2,847.54
  rectangle net VIN: 1151.23,842.6 1176.23,877.54
  rectangle net VIN: 1151.23,831 1228.47,855
  rectangle net VIN: 1193.47,802.54 1228.47,847.54
  rectangle net NetD2_2: -184,724 57.47,803.46
  rectangle net GND: 183.91,486.93 209,643.41
  rectangle net GND: 90.4,558.22 195.54,574.25
  rectangle net NetR1_1: 183.89,651.12 194.72,678.59
  rectangle net NetR1_1: 161.93,651.12 194.72,656
  rectangle net NetR1_1: 161.93,616.78 173.89,652.12
  rectangle net GND: -70.42,558.22 108.5,680.72
  rectangle net NetR2_1: 156.02,459.93 172.89,550.27
  rectangle net NetC1_2: -10.92,332.95 108.55,550.27
  rectangle net VOUT_12V: -176.63,233.47 -77.85,633.72
  rectangle net GND: 12,214.34 105.09,263.2
  rectangle net OPTO_IN: 40,154.46 105.09,203.32
  region net VOUT_12V: 213,321 213,296 198,281 178,281 157.57,301.43
  region net VDDTXRX2: 762,1124 841,1203 876.34,1203 876.34,1237 837,1237 734,1134 734,1117 762,1117 762,1154.22
Bottom Layer:
  rectangle net RCS: -111,193 -37,221
  rectangle net 5V_EXT: 456,-174 562,-145.66
  rectangle net 5V_EXT: 456.17,-156.12 523.2,-24.6
  rectangle net GND: 28.4,113 166.23,165.39
  rectangle net 5V_EXT: 729,820 1050.37,853.7
  rectangle net VCC_3V3: 1354,547.04 1386.56,586.41
  rectangle net GND: 632.75,930.97 729,1051.21
  rectangle net VDDTXRX2: 377.78,883 451.81,1007.23
  rectangle net GND: 304.88,374.25 391.34,455.75
  rectangle net VCC_3V3: 478.29,126.43 553.71,173.57
  rectangle net GND: 1266.01,923.33 1403.8,1110.27
  rectangle net GND: 1211.5,156 1327.11,206
  rectangle net VCC_3V3: 88.35,924.25 180,1005.75
  rectangle net VIN: 645.1,299.93 708.48,401.58
  rectangle net 5V_EXT: 729,678.93 771.96,825
  rectangle net 5VOUT: 982.09,643.65 1004,693.62
  rectangle net 5VOUT: 982.09,641.15 1050.37,671.06
  rectangle net VDDTXRX1: 290.44,966 348.19,1005.75
  rectangle net VDDTXRX1: 247,922 348.19,980.1
  rectangle net VDDTXRX2: 304.88,824.25 451.81,905.75
  rectangle net 5V_EXT: 899.98,764.5 1050.37,844.52
  rectangle net VIN: 645.1,348.55 1179.48,401.58
  rectangle net VIN: 763,950.82 1147.9,1110.27
  rectangle net VIN: 964.83,919 1147.9,1075.96
  region net GND: 393.97,81.62 249.69,81.62 249.69,-30.5 393.97,-30.5
  rectangle net NetC8_1: 594.21,126.33 634.76,162.16
  rectangle net GND: 514.3,104.8 567.64,116.99
  rectangle net VCC_3V3: 514.3,126.43 567.64,140.24
  rectangle net 5V_EXT: 405.97,72.79 583.39,93.99
  rectangle net VOUT_12V: 147,-65.81 239.23,85
  rectangle net NetC7_2: 285.7,-103.21 333.72,-79.59
  region net NetC7_2: 311.95,-79.59 285.7,-79.59 285.7,-156.32 311.95,-156.32
  rectangle net NetC7_1: 294.35,-65.81 402.79,-42.19
  rectangle net NetC7_1: 324,-156.31 350.25,-118
  rectangle net NetC7_1: 345.25,-156.31 402.79,-42.19
  rectangle net 5V_EXT: 405.97,-30.5 583.39,81.62
  rectangle net VIN: 1159.89,221 1209.07,493.48
  rectangle net VIN: 1160,221 1332.09,323.21
  rectangle net 5V_EXT: 1089.91,678.93 1153.89,690.74
  rectangle net NetR23_1: 792.74,694.68 880.34,799.5
  rectangle net 5VOUT: 1011.87,641.15 1050.37,671.06
  rectangle net 5VOUT: 982.09,659.25 1153.89,671.06
  rectangle net VOUT_12V: -176.63,233.47 -64.22,292.53
  region net 5V_EXT: 1099.62,678.93 1011.87,678.93 1011.87,840.04 1050.37,840.04 1050.37,706.62 1089.91,706.62 1089.91,694.24 1099.62,684.53
Power (plane layer: these items are gaps in the copper):
  lines w10: 1070.77,-204.72 1073,-202.5 ; 410.04,-204.72 410.04,-204.72
  lines w30: -204.73,12.98 -204.73,-42.19 297.32,-42.19 418,-42.19 418,80 ; -204.73,1268 -204.73,-41.8 -87.35,-159.19 ; -196.19,365.96 418,365.96 418,80 ; -63,1417.21 -95,1385.21 -95,515 418,515 418,302.42 ; -41.81,-204.72 410.04,-204.72 ; 562,-198.8 625,-198.8 ; 625,80 418,80 ; 703.83,872.52 337.61,872.52 337.61,1043 ; 708.48,451.37 515.77,451.37 515.77,735.64 209,735.64 209,1043 337.61,1043 ; 792,-204.72 792,1043 ; 792,872.52 708.48,872.52 708.48,80 673.17,80 418,80 ; 792,1005.63 792,1043 ; 887.91,-199 887.91,612.16 ; 887.91,607.04 887.91,974 1277.9,974 1277.9,881.04 960.12,881.04 960.12,-39.39 992,-71.27 992,-199 ; 960.12,493.86 1429.86,493.86 ; 960.12,738.06 1425.19,738.06 ; 1098,-206 1098,382.11 1425.19,382.11 ; 1423.84,1134 1423.84,1043 792,1043 ; 337.61,1043 792,1043
Ground (plane layer: these items are gaps in the copper):
  lines w10: 1196.99,68.99 1202.99,62.99
  lines w30: 720,1448.82 1039,1448.82 ; 976.76,10.82 976.76,1062.01 1211.5,1062.01 1211.5,799.21 1122.33,710.04 1122.33,362.79 1122.33,10.82 976.76,10.82

## Silkscreen, mask and mechanical layers (free items; w line width, h text height)
Top Overlay:
  lines w10: -132,578.22 -104.44,578.22 ; -20,684.22 52,684.22 ; 1134.31,463.29 1134.31,490.4 1137.77,493.86 1151.25,493.86 ; 1135.58,144.7 1135.58,109.43 1144.02,101 1155.21,101 ; 1147.08,900.55 1173.54,900.55 1183.1,910.11 ; 1170.1,792.78 1170.1,673.75 1190.72,653.13 1292.78,653.13 ; 1205.07,792.78 1205.07,732.86 1219.62,718.3 1293.48,718.3 ; 1256.36,792.78 1256.36,774.57 1267.44,763.49 1289.71,763.49
  text "GND" at 520,1384 h50
  text "VIN" at 791,1383.4 h50
  text "5VOUT" at 955,1382.6 h50
  text "RJ45_B" at 356.16,1318.13 h50
  text "ARDUINO" at -199.33,1115.99 h40
  text "HEADER" at -27,1116.01 h40
  text "POWER" at -55.32,709.66 h40 r90
  text "RJ45_A" at 354.11,601.41 h50
  text "12V" at 154,257.75 h50
  text "PUMP" at -55.32,109 h40 r90
  text "MOTOR OUT" at 788,-98 h40
  text "5V_EXT" at 467,-109.48 h50
  text "3V3" at 643,-117.5 h50
  text "CS" at 40,-118.4 h50
  text "MISO" at 295.98,-117.71 h50
  text "SCK" at 177.45,-120 h50 r90
  text "MOSI" at 274.19,-120 h50 r90
Bottom Overlay:
  lines w8: 886.64,515 895.71,515 993.36,612.65 1062.89,612.65 ; 890,576.41 941.83,576.41 1003.57,638.15 1015.8,638.15
  lines w10: 195.06,25.8 216.59,25.8 ; 423.97,-32.61 435.16,-43.81 522.25,-43.81 ; 964.83,806.83 964.83,769.17 986.88,747.12 1061.41,747.12
  text "Interface_v3.3" at 1254,1376.58 h50
  text "INTERFACING HEADER" at 376.99,1122 h50
Board Outline:
  lines w10: -203.19,-43.35 -203.19,1281.82 ; -203.19,-43.35 -41.81,-204.72 1265.27,-204.72 1425.19,-44.8 1425.19,1286.73 1263.1,1448.82 -36.19,1448.82 -203.19,1281.82 ; -203.19,-43.35 -203.19,1281.82

## Dimensions
-203.19,-43.35 to 1425.19,-44.8 on Dimension
-36.19,1448.82 to -41.81,-204.72 on Dimension

## Text inside footprints (layer, text, board x,y; h text height)
J5: Top Overlay "1" at 945.11,456.41 h39.37 r90
J6: Bottom Overlay "1" at 349.27,1028.63 h30 r90
J7: Top Overlay "1" at 945.11,1173.13 h39.37 r90